# Altium PCB Smart_Connect_Board.PcbDoc (part 1 of 5)
Units mil, origin at the board's own origin, x right, y up, seen from the top; angles counter-clockwise.
Board outline 3543.31 x 3149.61 mil, 2 copper layers (Top Layer, Bottom Layer), stack 61.811 mil thick; 211 components, 139 nets, 660 pads, 247 vias.
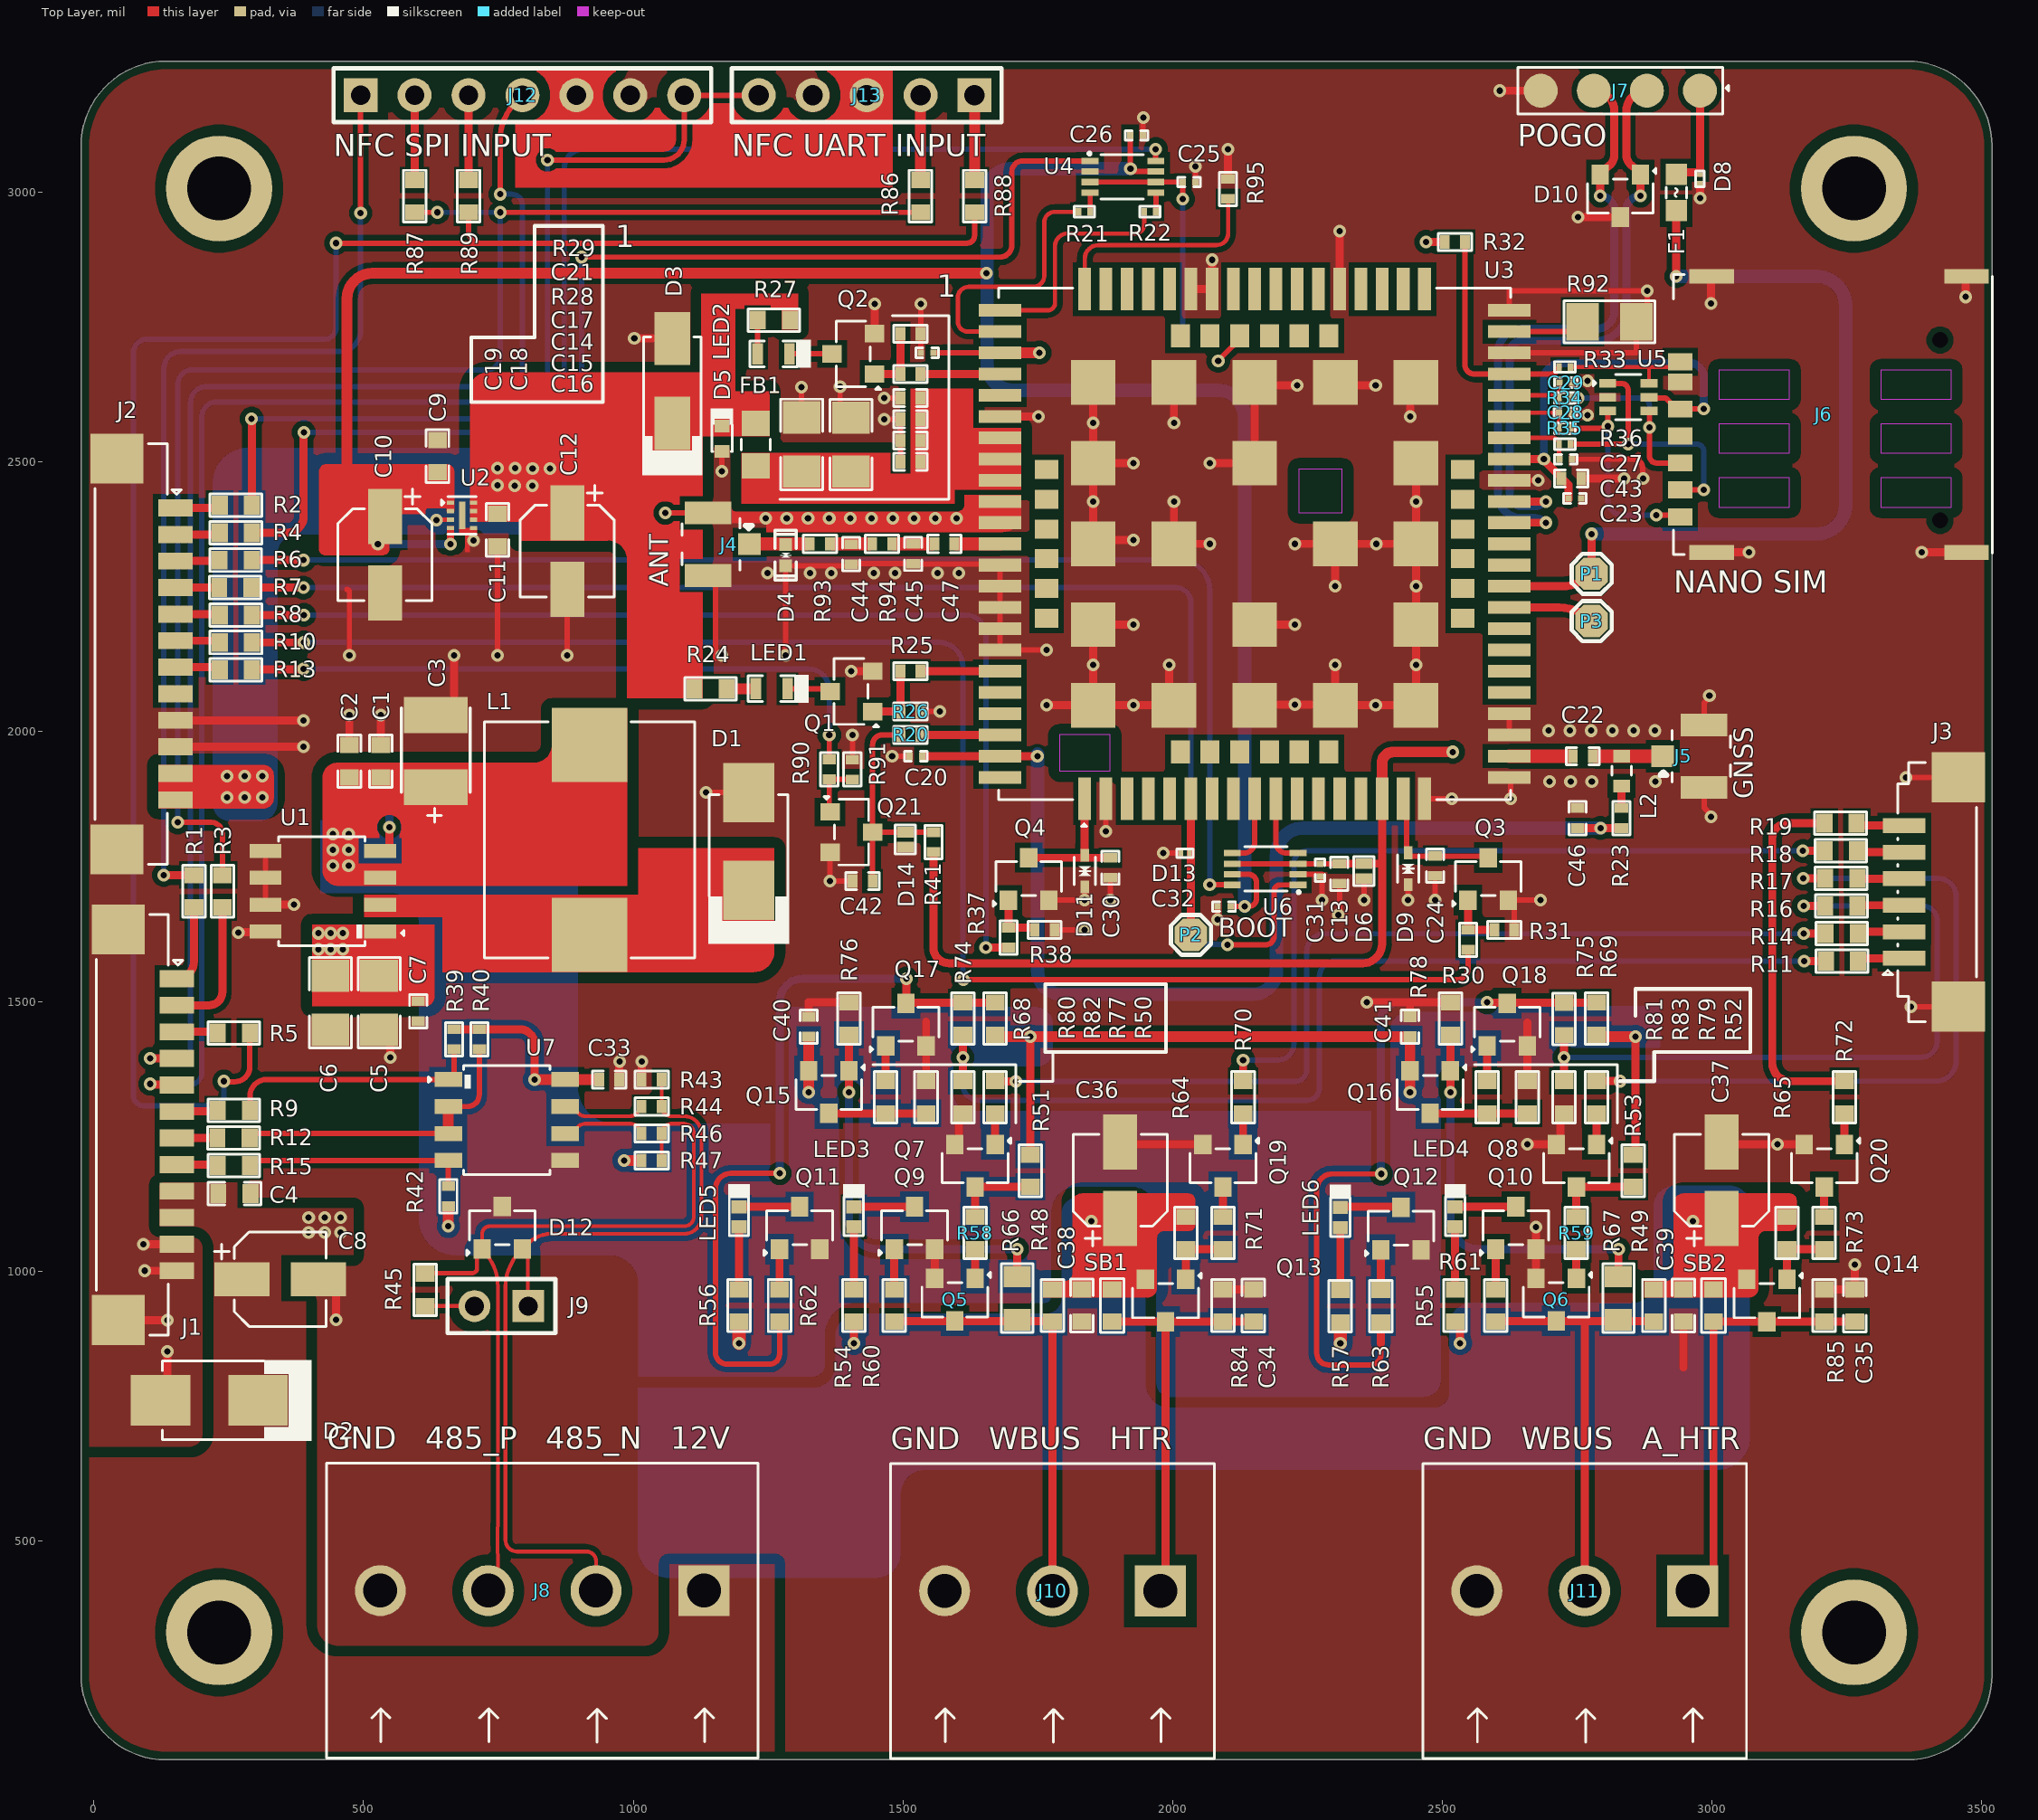
[diagram p0: Top Layer view]
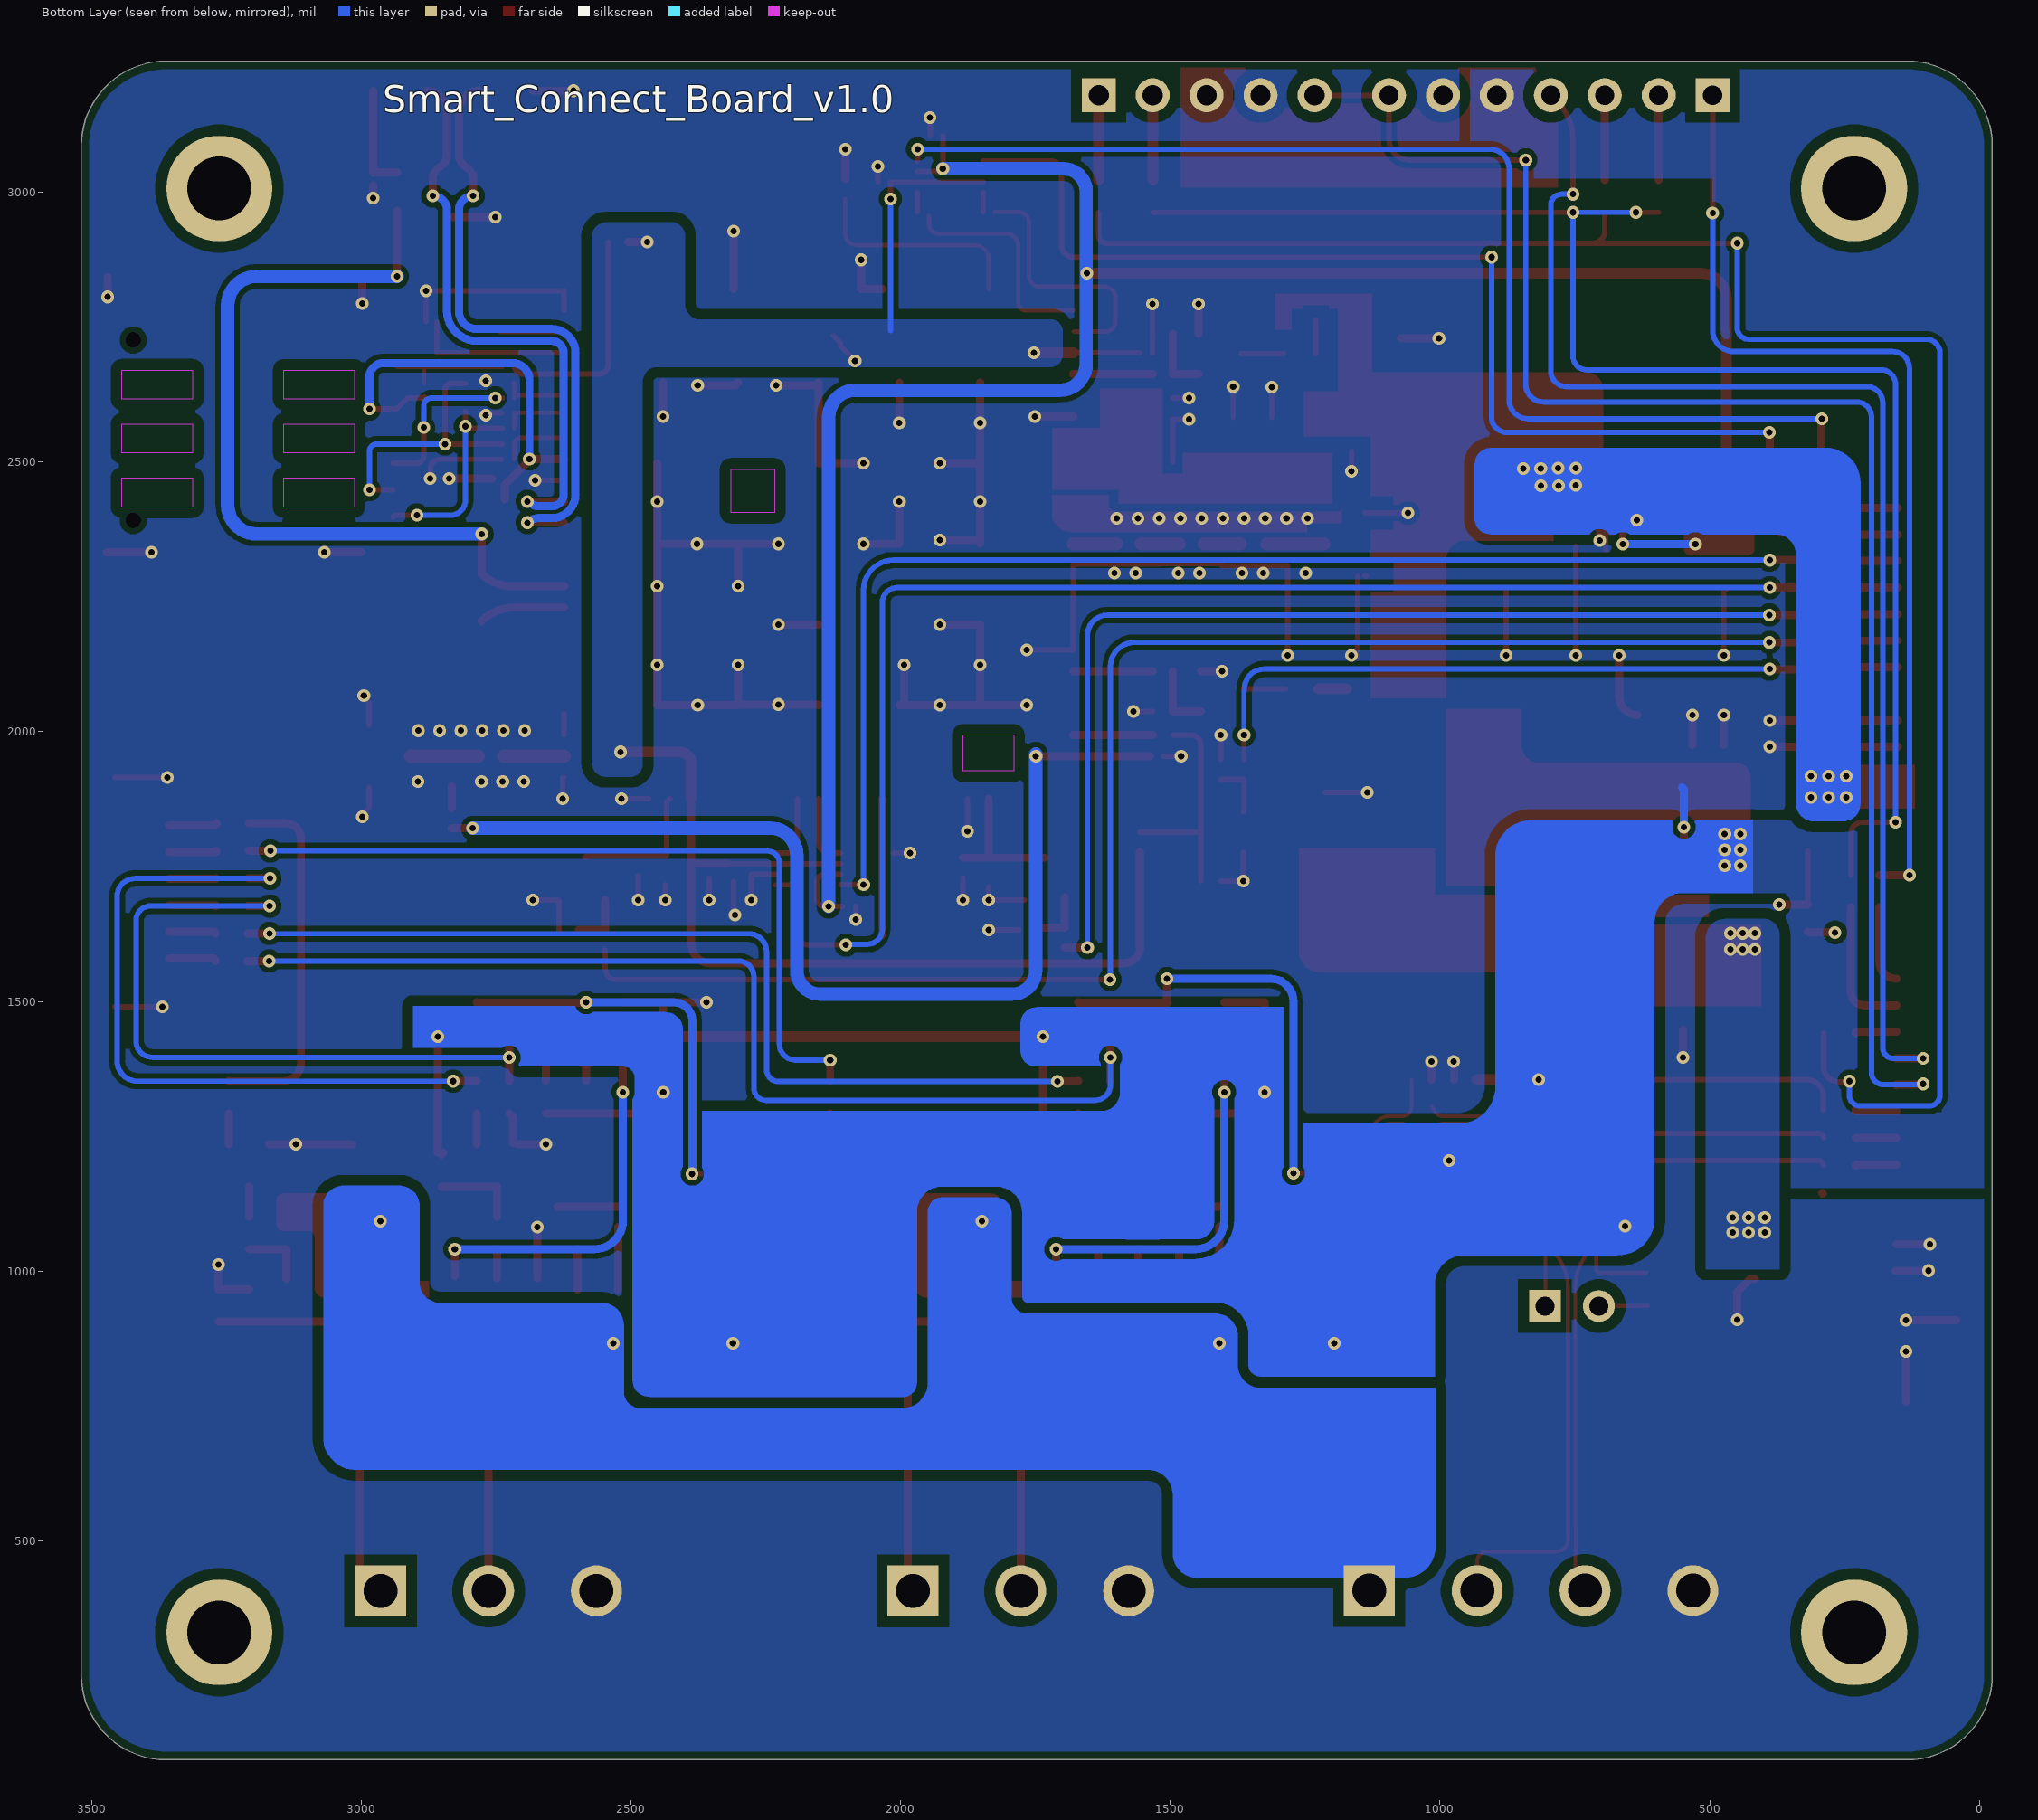
[diagram p1: Bottom Layer view, seen from below]
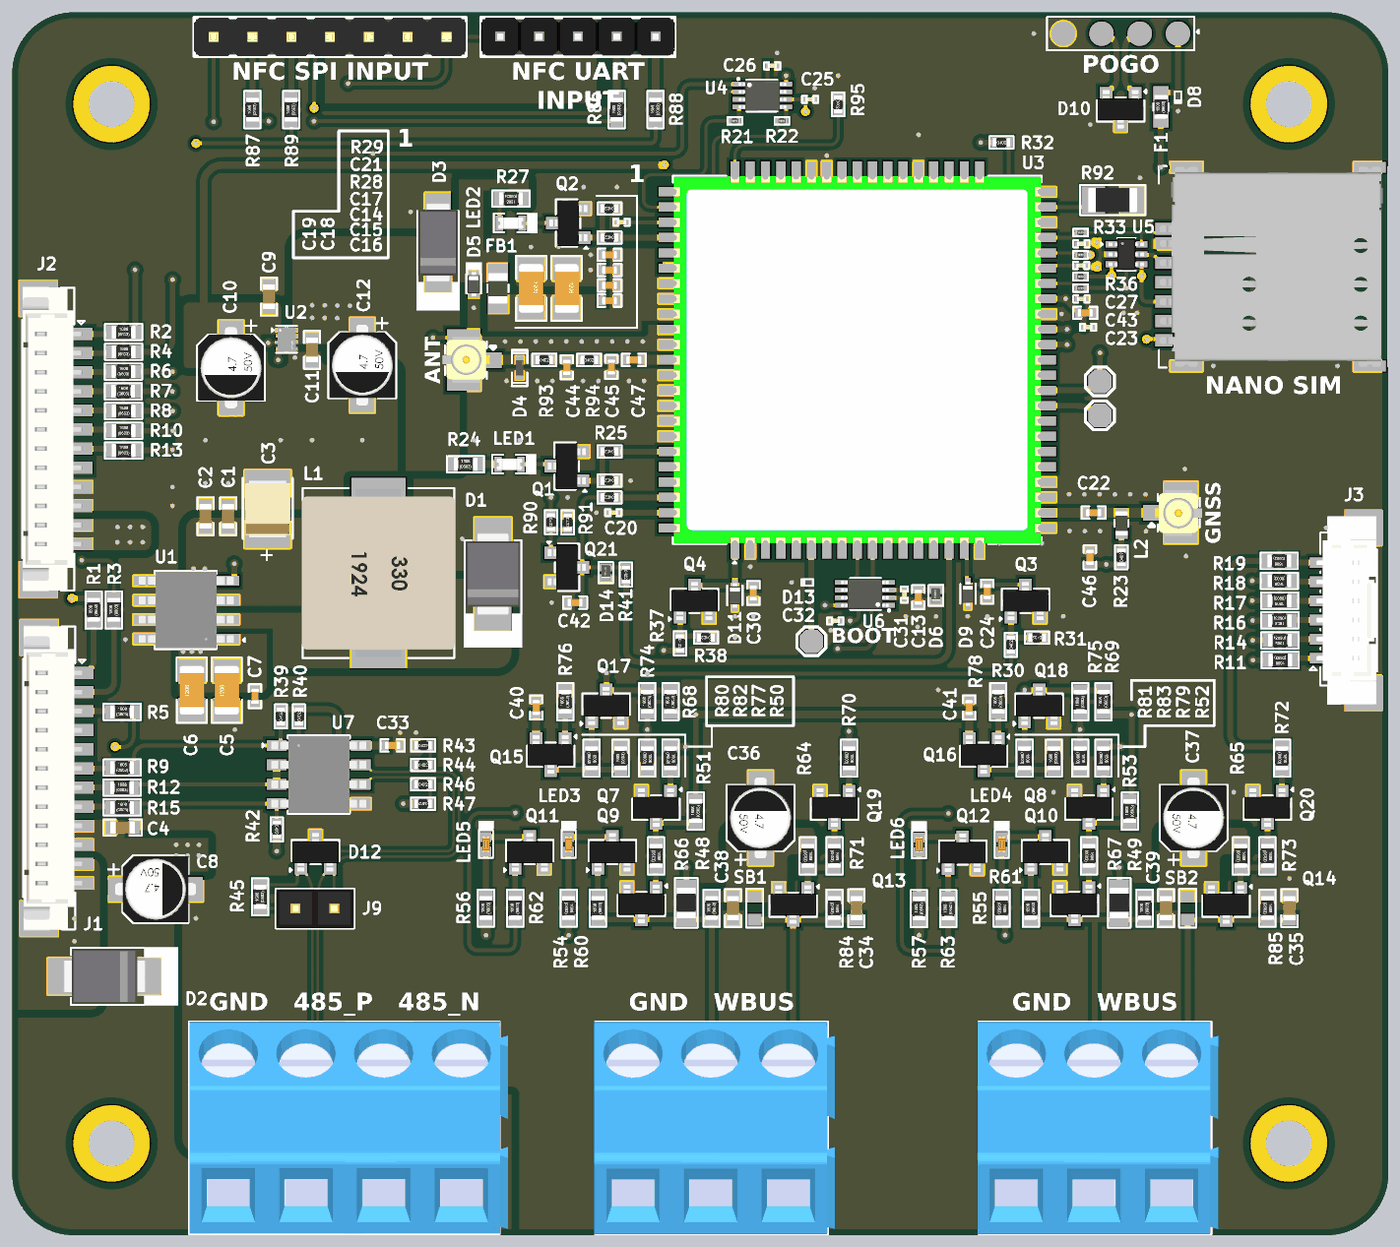
[diagram p4: 3D render of the assembled board from above, using the file's embedded part models]

## Layer stack, top to bottom
Top Solder: solder mask 1, Solder Resist, Dk 3.5
Top Layer: signal copper 1.378
Dielectric 1: dielectric 59.055, FR-4, Dk 4.6
Bottom Layer: signal copper 1.378
Bottom Solder: solder mask 1, Solder Resist, Dk 3.5

## Board outline
-23.91,251.26 -23.91,3085.91 cw(c133.57,3085.91) 133.57,3243.39 3361.92,3243.39 cw(c3361.92,3085.91) 3519.4,3085.91 3519.4,251.26 cw(c3361.92,251.26) 3361.92,93.78 133.57,93.78 cw(c133.57,251.26)

## Design rules (kind name [scope] priority, off if disabled: settings)
BoardOutlineClearance [All] p1: gap=0 ignorepadtopadclearanceinfootprint=FALSE except(10: Arc-OutlineEdge; 15: Poly-OutlineEdge)
Clearance [All] p1: gap=10 ignorepadtopadclearanceinfootprint=FALSE except(4: SMDPad-SMDPad; 6: Arc-Arc Arc-Track Arc-SMDPad Track-Track Track-SMDPad; 7: Arc-Fill Track-Via Track-Fill Track-Region Track-Text SMDPad-Fill SMDPad-Region THPad-THPad Fill-Fill; 8: Region-Region; 20: THPad-Poly Fill-Poly Poly-Poly Poly-Region)
ComponentClearance [All] p1: gap=0 collisioncheckmode=3 verticalgap=0 showdistances=FALSE
DiffPairsRouting Diff_USB [InDifferentialPair('GSM_USB_D')] p1: maxlimit=7 minlimit=7 mostfreqgap=7 toplayer_minwidth=15 toplayer_maxwidth=15 toplayer_prefwidth=15 bottomlayer_minwidth=15 bottomlayer_maxwidth=15 bottomlayer_prefwidth=15 impedanceprofiledriven=TRUE impedanceprofileid={AF431588-A3C0-40A6-A26B-CB03469C8758} impedanceprofilevalue=90.000000 maxuncoupledlength=500
DiffPairsRouting Diff_RS485 [InDifferentialPairClass('DIFF_485')] p2: maxlimit=7 minlimit=7 mostfreqgap=7 toplayer_minwidth=7 toplayer_maxwidth=7 toplayer_prefwidth=7 bottomlayer_minwidth=7 bottomlayer_maxwidth=7 bottomlayer_prefwidth=7 impedanceprofiledriven=TRUE impedanceprofileid={B07F3FA8-E737-4355-8B57-E81E2D3FB21B} impedanceprofilevalue=120.000000 maxuncoupledlength=500
HoleSize [All] p1: absolutevalues=TRUE maxlimit=137.8 minlimit=1 maxpercent=80.000 minpercent=20.000
MatchedLengths "Schematic Matched Net Lengths_1" [InNetClass('GSM_USB')] p1: tolerance=100 checknetsindiffpair=TRUE checkdiffpairvsdiffpair=FALSE checkxsignals=FALSE checkothers=FALSE
MaxMinImpedance "Schematic Impedance Constraint" [InNetClass('GSM_USB')] p1: minimum=88.00 maximum=90.00
MinimumSolderMaskSliver [All] p1: minsoldermaskwidth=0
PolygonConnect [All] p1: connectstyle=Direct reliefconductorwidth=10 reliefentries=4 polygonreliefangle="90 Angle" airgapwidth=10
RoutingVias [All] p1: holewidth=11.81 width=23.62 viastyle="Through Hole" minholewidth=7.87 minwidth=15.75 maxholewidth=23.62 maxwidth=39.37
SilkToSilkClearance [All] p1: silktosilkclearance=0
SilkToSolderMaskClearance [IsPad] p1: minsilkscreentomaskgap=0 clearancetoexposedcopper=TRUE
SolderMaskExpansion [All] p1: expansion=4 istentingtop=FALSE
SupplyNets "Schematic Supply Nets_9" [InNet('SIM_VDD')] p1: voltage=0.000
SupplyNets "Schematic Supply Nets_8" [InNet('VCC')] p2: voltage=0.000
SupplyNets "Schematic Supply Nets_6" [InNet('USB_VBUS')] p3: voltage=0.000
SupplyNets "Schematic Supply Nets_5" [InNet('GSM_PWR')] p4: voltage=0.000
SupplyNets "Schematic Supply Nets_4" [InNet('VDD_EXT')] p5: voltage=0.000
SupplyNets "Schematic Supply Nets_3" [InNet('2V8')] p6: voltage=0.000
SupplyNets "Schematic Supply Nets_2" [InNet('3V3_GSM')] p7: voltage=0.000
SupplyNets "Schematic Supply Nets" [InNet('3V3')] p8: voltage=0.000
SupplyNets "Schematic Supply Nets_7" [InNet('GND')] p9: voltage=0.000
Width [All] p1: maxlimit=100 minlimit=7 preferedwidth=10 minimp=50.000000 maximp=50.000000 favimp=50.000000
24 further rules are at their usual default settings.

## Classes and differential pairs
differential pair class DIFF_485: 485-4 RS485
differential pair class GSM_USB_Lines: GSM_USB_D
net class GSM_USB: GSM_USB_D_N GSM_USB_D_P
component class Ultrasonic_NFC_Sheet: C33 D12 J9 J12 J13 R39 R40 R42 R43 R44 R45 R46 R47 R86 R87 R88 R89 U7
component class Power-Sheet: C1 C2 C3 C4 C5 C6 C7 C8 C9 C10 C11 C12 D1 D2 D3 J1 J2 J3 L1 R1 R2 R3 R4 R5 R6 R7 R8 R9 R10 R11 R12 R13 R14 R15 R16 R17 R18 R19 U1 U2
component class Heater_Sheet: C34 C35 C36 C37 C38 C39 C40 C41 J10 J11 LED3 LED4 LED5 LED6 Q5 Q6 Q7 Q8 Q9 Q10 Q11 Q12 Q13 Q14 Q15 Q16 Q17 Q18 Q19 Q20 R48 R49 R50 R51 R52 R53 R54 R55 R56 R57 R58 R59 R60 R61 R62 R63 R64 R65 R66 R67 R68 R69 R70 R71 R72 R73 R74 R75 R76 R77 R78 R79 R80 R81 R82 R83 R84 R85 SB1 SB2
component class GSM_Sheet: C13 C14 C15 C16 C17 C18 C19 C20 C21 C22 C23 C24 C25 C26 C27 C28 C29 C30 C31 C32 C42 C43 C44 C45 C46 C47 D4 D5 D6 D8 D9 D10 D11 D13 D14 F1 FB1 J4 J5 J6 J7 L2 LED1 LED2 P1 P2 P3 Q1 Q2 Q3 Q4 Q21 R20 R21 R22 R23 R24 R25 R26 R27 R28 R29 R30 R31 R32 R33 R34 R35 R36 R37 R38 R41 R90 R91 R92 R93 R94 R95 U3 U4 U5 U6
differential pair 485-4: +485-4_P -485-4_N
differential pair RS485: +RS485_P -RS485_N
differential pair GSM_USB_D: +GSM_USB_D_P -GSM_USB_D_N

## Components (designator, comment, footprint, x,y, rotation, side; value= is the part's Value field where it differs from the comment)
C1 "0.1uF" Cap-0603 532.09,1945.38 r270 top
C2 "0.1uF" Cap-0603 473.63,1945.37 r270 top
C3 "100uF" Case-B 633.91,1964.08 r90 top
C4 "0.1uF" Cap-0603 260.36,1143.58 r180 top
C5 "47uF" Cap-1206 528.63,1497.26 r90 top
C6 "47uF" Cap-1206 438.63,1497.26 r90 top
C7 "0.1uF" Cap-0402#1 601.19,1481.78 r90 top value=100nF
C8 "10uF" RVT1E100M0405_ 345.08,984.85 r0 top
C9 "0.1uF" Cap-0603 637.13,2511.1 r270 top
C10 "10uF" RVT1E100M0405_ 539.53,2328.1 r270 top
C11 "0.1uF" Cap-0603 748.06,2374.02 r90 top
C12 "10uF" RVT1E100M0405_ 877.5,2334.64 r270 top
C13 "2.2uf" Cap-0402#1 2309.13,1736.86 r270 top
C14 "10pF" Cap-0402#1 1514.06,2579.55 r0 top
C15 "33pF" Cap-0402#1 1514.06,2540.18 r0 top
C16 "0.1uF" Cap-0402#1 1514.06,2500.81 r0 top
C17 "1uF" Cap-0402#1 1514.06,2618.92 r0 top
C18 "100uF" Cap-1206 1403.54,2532.44 r270 top
C19 "100uF" Cap-1206 1312.15,2532.68 r270 top
C20 "0.1uF" CAP-0201#1 1524.05,1954.63 r180 top
C21 "0.1uF" CAP-0201#2 1545.05,2702.66 r180 top
C22 "33pF" Cap-0402#1 2760.65,1954.63 r0 top
C23 "0.1uF" CAP-0201#2 2746.13,2432.63 r0 top
C24 "0.1uf" Cap-0402#1 2486.98,1751.45 r90 top
C25 "0.1uF" CAP-0201#2 2030.76,3019.21 r180 top
C26 "0.1uF" CAP-0201#3 1933.14,3105.5 r180 top
C27 "22pF" CAP-0201#2 2729.43,2505.17 r180 top
C28 "22pF" CAP-0201#2 2728.41,2591.36 r180 top
C29 "22pF" CAP-0201#2 2729.43,2647.27 r180 top
C30 "0.1uf" Cap-0402#1 1884.63,1747.83 r90 top
C31 "0.1uF" CAP-0201#2 2273.41,1743.54 r270 top
C32 "0.1uF" CAP-0201#2 2095.56,1675.83 r180 top
C33 "0.1uf" Cap-0402#1 955.56,1355.05 r180 top
C34 "0.1uF" Cap-0603 2150.04,936.02 r270 top
C35 "0.1uF" Cap-0603 3265.04,936.02 r270 top
C36 "10uF" RVT1E100M0405_ 1903.04,1168.39 r90 top
C37 "10uF" RVT1E100M0405_ 3018.04,1168.39 r90 top
C38 "1uF" Cap-0603 1832.04,936.02 r90 top
C39 "1uF" Cap-0603 2947.04,936.02 r90 top
C40 "1uF" Cap-0402#1 1325.26,1453.02 r270 top
C41 "1uF" Cap-0402#2 2440.26,1453.02 r270 top
C42 "0.1uf" Cap-0402#1 1425.29,1723.02 r0 top
C43 "33pF" Cap-0402#1 2739.43,2469.35 r180 top
C44 "DNP" Cap-0402#1 1404.21,2329.17 r90 top
C45 "DNP" Cap-0402#1 1519.05,2329.83 r90 top
C46 "1uF" Cap-0402#1 2751.15,1839.83 r270 top
C47 "100pF" Cap-0402#1 1577,2348.33 r0 top
D1 "SS510B" SMB_ 1214.09,1796.63 r270 top
D2 "SMBJ5355B-MS" SMB_ 213.9,760.28 r0 top
D3 "1SMA5930BT3G" SMA 1072.5,2650.51 r90 top
D4 "TPESD0402G03V" TPESD0402G03V 1282.68,2327.59 r90 top
D5 "LESD5D5.0CT1G" SOD-523 1164.47,2543.39 r90 top
D6 "LESD8D3.3CAT5G" "SOD-882 Bi Directional" 2354.81,1741.58 r270 top
D8 "PESD5V0H1BSFYL" DSN0603-2 2977.92,3025.13 r90 top
D9 "LESD5D5.0CT1G" "SOD-523 (Bi-Directional)" 2436.91,1745.95 r90 top
D10 "ESD5302F-3/TR" Sot-23 2830.28,2993.63 r180 top
D11 "LESD5D5.0CT1G" "SOD-523 (Bi-Directional)" 1837.08,1741.65 r90 top
D12 "SM712" SOT-23 757.06,1080.06 r0 top
D13 "PESD5V0H1BSFYL" DSN0603-2 2023.3,1775.04 r0 top
D14 "LESD8D3.3CAT5G" "SOD-882 Bi Directional" 1504.56,1800.09 r270 top
F1 "SMD0603-050" Fuse-0603 2934.08,2999.69 r90 top
FB1 "100MHz" Ind-0805 1227.15,2532.4 r90 top
J1 "HC-1.25-12PLT" HC-1.25-12PLT 99.36,1271.28 r270 top
J2 "HC-1.25-12PLT" HC-1.25-12PLT 97.05,2144.27 r270 top
J3 "HC-1.25-6PLT" HC-1.25-6PLT 3406.86,1702.89 r90 top
J4 "U.FL-R-SMT-1(80)" U.FL-R-SMT-1(80)_ 1177.15,2347.67 r90 top
J5 "U.FL-R-SMT-1(80)" U.FL-R-SMT-1(80)_ 2947.15,1954.63 r270 top
J6 "XKNANO-113" XKNANO-113 3206.84,2588.53 r90 top
J7 "POGO Connector 4 Pin" "Pogo 4 Pin" 2830.28,3188.63 r180 top
J8 "TB008A-508-04BE" TB008A-508-04BE 1131.04,407.34 r180 top
J9 "X6511WV-02H-C60D30" HDR1X2_ 805.57,935.05 r180 top
J10 "TB008A-508-03BE" TB008A-508-03BE 1977.35,406.98 r180 top
J11 "TB008A-508-03BE" TB008A-508-03BE 2964.24,406.98 r180 top
J12 "PZ254V-11-07P" HDR1X7 494.54,3180.22 r0 top
J13 "PZ254V-11-05P" HDR1X5_ 1632.78,3180.22 r180 top
L1 "47uH" MDA1040-470M 919.09,1799.26 r90 top
L2 "68nH" "IND-0603 (1608 Metric)" 2832.58,1927.07 r90 top
LED1 "Yellow" LED-0603 1256.56,2079.71 r0 top
LED2 "RED" LED-0603 1260.19,2700.69 r0 top
LED3 "Red" LED-0402 1409.04,1100.32 r90 top
LED4 "Red" LED-0402 2524.04,1100.33 r90 top
LED5 "Red" LED-0402 1196.1,1100.33 r90 top
LED6 "Red" LED-0402 2311.05,1099.14 r90 top
P1 "TEST POINT" Test-point 2777.15,2292.78 r90 top
P2 "TEST POINT" Test-point 2034.04,1623.33 r90 top
P3 "TEST POINT" Test-point 2777.15,2205.22 r90 top
Q1 "MMBT2222A-7-F" SOT-23 1404.42,2074.71 r90 top
Q2 "MMBT2222A-7-F" SOT-23 1408.05,2700.69 r90 top
Q3 "MMBT2222A-7-F" SOT-23 2585.22,1726.96 r0 top
Q4 "MMBT2222A-7-F" SOT-23 1733.15,1726.96 r0 top
Q5 "BC847C,215" SOT-23 1596.36,947 r180 top
Q6 "BC847C,215" SOT-23 2711.36,947 r180 top
Q7 "BC847C,215" SOT-23 1633.76,1195.39 r180 top
Q8 "BC847C,215" SOT-23 2748.76,1195.39 r180 top
Q9 "BC847C,215" SOT-23 1521.56,1079.88 r0 top
Q10 "BC847C,215" SOT-23 2636.56,1079.88 r0 top
Q11 "BC847C,215" SOT-23 1308.64,1079.88 r0 top
Q12 "BC847C,215" SOT-23 2423.58,1078.69 r0 top
Q13 "IRLML6402TRPBF" SOT-23 1987.04,945.39 r180 top
Q14 "IRLML6402TRPBF" SOT-23 3102.04,945.39 r180 top
Q15 "BC857A,215" SOT-23 1362.66,1331.73 r180 top
Q16 "BC857A,215" SOT-23 2477.65,1331.72 r180 top
Q17 "BC847C,215" SOT-23 1505.52,1457.04 r0 top
Q18 "BC847C,215" SOT-23 2620.52,1457.04 r0 top
Q19 "MMBT5551" SOT-23 2093.4,1195.39 r180 top
Q20 "MMBT5551" SOT-23 3208.4,1195.39 r180 top
Q21 "MMBT2222A-7-F" SOT-23 1404.42,1813.87 r270 top
R1 "0R" Res-0603 185.57,1704.27 r270 top
R2 "0R" Res-0603 263.05,2419.94 r180 top
R3 "0R" Res-0603 238.05,1704.27 r270 top
R4 "0R" Res-0603 263.05,2369.06 r180 top
R5 "0R" Res-0603 259.36,1441.52 r180 top
R6 "0R" Res-0603 262.54,2318.18 r180 top
R7 "0R" Res-0603 262.03,2267.3 r180 top
R8 "0R" Res-0603 263.05,2216.42 r180 top
R9 "0R" Res-0603 259.36,1297.88 r180 top
R10 "0R" Res-0603 263.05,2165.54 r180 top
R11 "0R" Res-0603 3241.19,1574.85 r0 top
R12 "0R" Res-0603 258.85,1246.67 r180 top
R13 "0R" Res-0603 263.05,2114.66 r180 top
R14 "0R" Res-0603 3240.68,1625.93 r0 top
R15 "0R" Res-0603 259.36,1195.45 r180 top
R16 "0R" Res-0603 3240.18,1677.02 r0 top
R17 "0R" Res-0603 3239.67,1728.1 r0 top
R18 "0R" Res-0603 3239.16,1779.19 r0 top
R19 "0R" Res-0603 3238.65,1830.28 r0 top
R20 "10K" Res-0402 1514.06,1994 r180 top
R21 "1K" Res-0201 1836.55,2964.06 r0 top
R22 "1K" Res-0201 1958.17,2964.06 r0 top
R23 "10R" Res-0402 2832.15,1839.83 r90 top
R24 "220R" Res-0603 1143.22,2079.44 r180 top
R25 "4.7K" Res-0402 1514.06,2112.11 r180 top
R26 "47K" Res-0402 1514.06,2037.32 r180 top
R27 "220R" Res-0603 1260.66,2763.39 r0 top
R28 "4.7K" Res-0402 1514.06,2663.29 r180 top
R29 "47K" Res-0402 1514.06,2738.09 r180 top
R30 "4.7K" Res-0402 2547.82,1614.32 r90 top
R31 "47K" Res-0402 2615.22,1632.82 r180 top
R32 "47K" Res-0402 2523.56,2908.28 r0 top
R33 "22R" Res-0201 2727.43,2676.29 r180 top
R34 "22R" Res-0201 2727.43,2618.92 r180 top
R35 "22R" Res-0201 2727.43,2562.78 r180 top
R36 "22R" Res-0201 2727.43,2533.18 r180 top
R37 "4.7K" Res-0402 1695.74,1618.32 r270 top
R38 "47K" Res-0402 1762.65,1632.82 r180 top
R39 "4.7K" Res-0402 667.5,1429.78 r90 top
R40 "4.7K" Res-0402 714.5,1429.78 r90 top
R41 "10K" Res-0402 1556.46,1795.37 r270 top
R42 "4.7K" Res-0402 657.23,1138.78 r270 top
R43 "10K" Res-0402 1034.06,1355.05 r0 top
R44 "0R" Res-0402 1034.06,1305.05 r0 top
R45 "120R" Res-0603 614.28,965.05 r270 top
R46 "0R" Res-0402 1034.06,1255.05 r0 top
R47 "10K" Res-0402 1034.06,1205.05 r180 top
R48 "1K" Res-0603 1777.35,936.02 r270 top
R49 "1K" Res-0603 2892.35,936.02 r270 top
R50 "4.7K" Res-0603 1671.17,1322.36 r90 top
R51 "4.7K" Res-0603 1736.32,1186.02 r270 top
R52 "4.7K" Res-0603 2786.17,1322.36 r90 top
R53 "4.7K" Res-0603 2854.04,1186.02 r270 top
R54 "1K" Res-0603 1409.04,936.02 r90 top
R55 "1K" Res-0603 2524.04,936.02 r90 top
R56 "330R" Res-0603 1196.12,936.02 r270 top
R57 "330R" Res-0603 2311.06,934.83 r270 top
R58 "4.7K" Res-0603 1633.76,1070.51 r90 top
R59 "4.7K" Res-0603 2748.76,1070.51 r90 top
R60 "100K" Res-0603 1484.16,936.02 r270 top value=100kR
R61 "100K" Res-0603 2599.16,936.02 r270 top value=100kR
R62 "100K" Res-0603 1271.23,936.02 r270 top value=100kR
R63 "100K" Res-0603 2386.17,934.83 r270 top value=100kR
R64 "10K" Res-0603 2024.44,1070.51 r90 top
R65 "10K" Res-0603 3139.44,1070.51 r90 top
R66 "47K" RES-0805 1711.86,949.77 r270 top
R67 "47K" RES-0805 2826.72,949.74 r270 top
R68 "4.7K" Res-0603 1671.18,1468.02 r270 top
R69 "4.7K" Res-0603 2786.18,1468.02 r270 top
R70 "4.7K" Res-0603 2130.8,1322.36 r90 top
R71 "1K" Res-0603 2093.39,1070.51 r90 top
R72 "4.7K" Res-0603 3245.8,1322.36 r90 top
R73 "1K" Res-0603 3208.39,1070.51 r90 top
R74 "1K" Res-0603 1611.18,1468.02 r270 top
R75 "1K" Res-0603 2726.17,1467.51 r270 top
R76 "150K" Res-0603 1400.06,1468.02 r270 top value=150kR
R77 "DNP" Res-0603 1611.17,1322.36 r90 top
R78 "150K" Res-0603 2515.06,1468.02 r270 top value=150kR
R79 "DNP" Res-0603 2726.18,1322.36 r90 top
R80 "4.7K" Res-0603 1468.12,1322.36 r90 top
R81 "4.7K" Res-0603 2583.12,1322.36 r90 top
R82 "10K" Res-0603 1542.92,1322.36 r270 top
R83 "10K" Res-0603 2657.91,1322.36 r270 top
R84 "1K" Res-0603 2093.39,936.02 r90 top
R85 "1K" Res-0603 3208.39,936.02 r90 top
R86 "0R" Res-0603 1532.78,2993.03 r270 top
R87 "DNP" Res-0603 594.54,2993.03 r270 top
R88 "0R" Res-0603 1632.78,2993.03 r270 top
R89 "DNP" Res-0603 694.54,2993.03 r270 top
R90 "4.7K" Res-0402 1363.42,1930.28 r270 top
R91 "47K" Res-0402 1406.26,1929.89 r270 top
R92 "51R" Res-1206 2810.12,2760.13 r180 top
R93 "0R" Res-0402 1346.04,2348.33 r0 top
R94 "0R" Res-0402 1461.48,2348.33 r0 top
R95 "470K" Res-0402 2103.01,3006.56 r270 top value=470kR
SB1 "Solder Bridge 0603" "Solder Bridge" 1888.03,936.02 r90 top
SB2 "Solder Bridge 0603" "Solder Bridge" 3003.03,936.02 r90 top
U1 "AP1509-33SG-13" SOP-8L 424.28,1704.27 r180 top
U2 "LD56100DPU33R" DFN-8(1.2x1.6) 682.6,2401.14 r0 top
U3 "A7672E (FASE)" "A7672E (FASE)" 2152.15,2348.33 r90 top
U4 "TXB0102DCUT" TXB0102DCUT 1907.97,3029.06 r0 top
U5 "SMF05CT1G-ES" SOT-363 2845.13,2620.29 r0 top
U6 "TXB0102DCUT" TXB0102DCUT 2171.83,1745.51 r180 top
U7 "SP3485EIM/TR" SOP-8 765.49,1280.05 r0 top

## Footprints (in the part's own frame and the unit in brackets; to place one, negate y for a bottom-side part, rotate by r counter-clockwise, add the part's x,y. Pads: shape width x height; smd on the part's side, far side on the other; paste and mask are expansions set on the pad)
"A7672E (FASE)" [mm]
  rect 2x0.6 smd: 1(-12,8) 2(-12,7) 3(-12,6) 4(-12,5) 5(-12,4) 6(-12,3) 7(-12,2) 8(-12,1) 9(-12,0) 10(-12,-1) 11(-12,-2) 12(-12,-3) 13(-12,-4) 14(-12,-5) 15(-12,-6) 16(-12,-7) 17(-12,-8) 35(12,-8) 36(12,-7) 37(12,-6) 38(12,-5) 39(12,-4) 40(12,-3) 41(12,-2) 42(12,-1) 43(12,0) 44(12,1) 45(12,2) 46(12,3) 47(12,4) 48(12,5) 49(12,6) 50(12,7) 51(12,8)
  rect 0.6x2 smd: 18(-8,-12) 19(-7,-12) 20(-6,-12) 21(-5,-12) 22(-4,-12) 23(-3,-12) 24(-2,-12) 25(-1,-12) 26(0,-12) 27(1,-12) 28(2,-12) 29(3,-12) 30(4,-12) 31(5,-12) 32(6,-12) 33(7,-12) 34(8,-12) 52(8,12) 53(7,12) 54(6,12) 55(5,12) 56(4,12) 57(3,12) 58(2,12) 59(1,12) 60(0,12) 61(-1,12) 62(-2,12) 63(-3,12) 64(-4,12) 65(-5,12) 66(-6,12) 67(-7,12) 68(-8,12) 89(-11,-12) 90(-10,-12) 91(-9,-12) 92(9,-12) 93(10,-12) 94(11,-12) 95(11,12) 96(10,12) 97(9,12) 98(-9,12) 99(-10,12) 100(-11,12)
  rect 2.1x2.1 smd: 69(-7.6,7.6) 70(-7.6,3.8) 71(-7.6,0) 72(-7.6,-3.8) 73(-7.6,-7.6) 74(-3.8,-7.6) 75(0,-7.6) 76(3.8,-7.6) 77(7.6,-7.6) 78(7.6,-3.8) 79(7.6,0) 80(7.6,3.8) 81(7.6,7.6) 82(3.8,7.6) 83(0,7.6) 84(-3.8,7.6) 85(-3.8,0) 86(0,-3.8) 87(3.8,0) 88(0,3.8)
  rect 1.1x0.9 smd: 101(-9.8,3.5) 102(-9.8,2.1) 103(-9.8,0.7) 104(-9.8,-0.7) 105(-9.8,-2.1) 106(-9.8,-3.5) 113(9.8,-3.5) 114(9.8,-2.1) 115(9.8,-0.7) 116(9.8,0.7) 117(9.8,2.1) 118(9.8,3.5)
  rect 0.9x1.1 smd: 107(-3.5,-9.8) 108(-2.1,-9.8) 109(-0.7,-9.8) 110(0.7,-9.8) 111(2.1,-9.8) 112(3.5,-9.8) 119(3.5,9.8) 120(2.1,9.8) 121(0.7,9.8) 122(-0.7,9.8) 123(-2.1,9.8) 124(-3.5,9.8)
  Keep-Out Layer region: 1.473,-4.133 3.523,-4.133 3.523,-2.083 1.473,-2.083
  Keep-Out Layer region: -10.7,6.795 -9,6.795 -9,9.195 -10.7,9.195
  silkscreen extent -13.31,-12.06 12.04,12.07, body extent -12,-12 12,12, height 2.5
CAP-0201#1 [mm]
  rect 0.3x0.381 smd mask+0.055: 1(-0.3,0) 2(0.3,0)
  silkscreen extent -0.53,-0.23 0.53,0.23, body extent -0.3,-0.15 0.3,0.15, height 0.28
CAP-0201#2 [mm]
  rect 0.3x0.3 smd mask+0.055: 1(-0.3,0) 2(0.3,0)
  silkscreen extent -0.53,-0.23 0.53,0.23, body extent -0.3,-0.15 0.3,0.15, height 0.28
CAP-0201#3 [mm]
  rect 0.3x0.508 smd mask+0.055: 1(-0.3,0) 2(0.3,0)
  silkscreen extent -0.53,-0.23 0.53,0.23, body extent -0.3,-0.15 0.3,0.15, height 0.28
Cap-0402#1 [mil]
  rect 18x25 smd mask+2.36: 1(-18.5,0) 2(18.5,0)
  silkscreen extent -31,-16 31,16, body extent -20,-10 20,10, height 19
Cap-0402#2 [mil]
  rect 20x25 smd mask+2.36: 1(-18.5,0) 2(18.5,0)
  silkscreen extent -31,-16 31,16, body extent -20,-10 20,10, height 19
Cap-0603 [mil]
  rect 30x35 smd mask+2.36: 1(-30,0) 2(30,0)
  silkscreen extent -49,-21 49,21, body extent -32,-16 31,16, height 34
Cap-1206 [mil] "SMD 1206"
  rect 60x70 smd: 1(-50,0) 2(50,0)
  silkscreen extent -84,-39 84,39, body extent -63,-31 63,32, height 39
Case-B [mm]
  rect 1.7x3 smd paste+0: 1(-1.7,0) 2(1.7,0)
  silkscreen extent -3.35,-1.63 2.03,1.63, body extent -1.85,-1.5 1.85,1.5, height 2.16
DFN-8(1.2x1.6) [mm]
  rect 0.345x0.2 smd paste+0 mask+0.051: 1(-0.547,0.6) 2(-0.547,0.2) 3(-0.547,-0.2) 4(-0.547,-0.6) 5(0.547,-0.6) 6(0.547,-0.2) 7(0.547,0.2) 8(0.547,0.6)
  rect 0.3x1.3 smd paste+0 mask+0.051: 9(0,0)
  silkscreen extent -0.98,-0.88 0.68,0.88, body extent -0.61,-0.81 0.61,0.81, height 0.4
DSN0603-2 [mm]
  rect 0.2x0.381 smd mask+0.055: 1(-0.2,0) 2(0.2,0)
  silkscreen extent -0.38,-0.2 0.38,0.2, body extent -0.3,-0.15 0.3,0.15, height 0.32
Fuse-0603 [mm]
  rect 1x1 smd: 1(-0.85,0) 2(0.85,0)
  silkscreen extent -0.25,-0.48 0.25,0.48, body extent -0.77,-0.42 0.78,0.43, height 0.45
HC-1.25-6PLT [mm]
  rect 0.7x2 smd: 1(-3.125,1.277) 2(-1.875,1.275) 3(-0.625,1.275) 4(0.625,1.275) 5(1.875,1.273) 6(3.125,1.273)
  rect 2.35x2.5 smd paste+0 mask+0.05: MP1(-5.4,-1.277) MP2(5.4,-1.277)
  silkscreen extent -6.11,-2.12 6.09,2.27, body extent -6.15,-2.08 6.15,1.84, height 4.71
HC-1.25-12PLT [mm]
  rect 0.8x1.62 smd paste+0 mask+0.05: 1(-6.875,1.38) 2(-5.625,1.38) 3(-4.375,1.38) 4(-3.125,1.38) 5(-1.875,1.38) 6(-0.625,1.38) 7(0.625,1.38) 8(1.875,1.38) 9(3.125,1.38) 10(4.375,1.38) 11(5.625,1.38) 12(6.875,1.38)
  rect 2.35x2.5 smd paste+0 mask+0.05: MP1(-9.2,-1.38) MP2(9.2,-1.38)
  silkscreen extent -9.91,-2.42 9.91,1.66, body extent -9.97,-2.38 9.97,1.52, height 4.75
HDR1X2_ [mm] "CONN HEADER VERT 2POS 2.54MM"
  rect 1.5x1.5 hole 0.9: 1(0,0)
  round 1.5 hole 0.9: 2(2.54,0)
  silkscreen extent -1.27,-1.27 3.81,1.27, body extent -1.27,-1.27 3.81,1.27, height 8.44
HDR1X5_ [mm] "Connector; Header; 5 Position"
  rect 1.6x1.6 hole 0.95: 1(0,0)
  round 1.6 hole 0.95: 2(2.54,0) 3(5.08,0) 4(7.62,0) 5(10.16,0)
  silkscreen extent -1.27,-1.27 11.43,1.27, body extent -1.27,-1.27 11.43,1.23, height 8.65
HDR1X7 [mm] "Connector; Header; 7 Position"
  rect 1.6x1.6 hole 0.9: 1(0,0)
  round 1.6 hole 0.9: 2(2.54,0) 3(5.08,0) 4(7.62,0) 5(10.16,0) 6(12.7,0) 7(15.24,0)
  silkscreen extent -1.27,-1.27 16.51,1.27, body extent -1.27,-1.24 16.51,1.25, height 8.74
"IND-0603 (1608 Metric)" [mm] "0.063\" L x 0.032\" W (1.60mm x 0.80mm)"
  rect 0.6x0.8 smd: 1(-0.7,0) 2(0.7,0)
  silkscreen extent -0.2,-0.46 0.23,0.46, body extent -0.8,-0.4 0.8,0.4, height 0.78
Ind-0805 [mm] "Inductor 0805"
  rect 1.2x1.32 smd: 1(-1,0) 2(1,0)
  silkscreen extent -0.25,-0.69 0.25,0.69, body extent -1,-0.62 1,0.63, height 0.47
LED-0402 [mm]
  rect 0.62x0.72 smd: 1(-0.475,0) 2(0.475,0)
  silkscreen extent -0.89,-0.51 1.55,0.51, body extent -0.5,-0.25 0.51,0.25, height 0.45
LED-0603 [mm]
  rect 0.5x1 smd: 1(-0.75,0) 2(0.75,0)
  silkscreen extent -1.12,-0.66 1.75,0.66, body extent -0.82,-0.37 0.82,0.36, height 0.68
MDA1040-470M [mm]
  rect 3.5x3.55 smd: 1(-4.475,0) 2(4.475,0)
  silkscreen extent -5.56,-4.95 5.56,4.95, body extent -5.5,-5 5.5,5, height 3.7
"Pogo 4 Pin" [mm]
  round 1.6 smd: 1(-3.75,0) 2(-1.25,0) 3(1.25,0) 4(3.75,0)
  silkscreen extent -5.11,-1.09 4.83,1.09
Res-0201 [mm]
  rect 0.27x0.37 smd mask+0.055: 1(-0.275,0) 2(0.275,0)
  silkscreen extent -0.48,-0.25 0.48,0.25, body extent -0.3,-0.15 0.3,0.15, height 0.29
Res-0402 [mil]
  rect 18x25 smd mask+2.17: 1(-18.5,0) 2(18.5,0)
  silkscreen extent -32,-17 32,16, body extent -23,-11 23,11, height 16
Res-0603 [mil]
  rect 30x35 smd: 1(-30,0) 2(30,0)
  silkscreen extent -48,-21 48,21, body extent -31,-17 31,17, height 18
RES-0805 [mil] "SMD 0805"
  rect 40x50 smd: 1(-40,0) 2(40,0)
  silkscreen extent -64,-29 64,29, body extent -39,-25 39,24, height 24
Res-1206 [mil]
  rect 60x70 smd: 1(-50,0) 2(50,0)
  silkscreen extent -84,-39 84,39, body extent -63,-31 63,31, height 24
RVT1E100M0405_ [mm] "10uF 25V 5.4mm SMD"
  rect 2.6x1.6 smd: 1(-1.8,0) 2(1.8,0)
  silkscreen extent -3.1,-2.22 2.16,2.22, body extent -2.65,-2.15 2.65,2.15, height 5.7
SMA [mm]
  rect 2.5x1.7 smd: 1(-2,0) 2(2,0)
  silkscreen extent -4.45,-1.42 2.06,1.42, body extent -2.6,-1.3 2.6,1.3, height 2.4
SMB_ [mm]
  rect 2.8x2.4 smd: 1(-2.3,0) 2(2.3,0)
  silkscreen extent -2.21,-1.9 4.83,1.91, body extent -2.7,-1.8 2.7,1.8, height 2.3
SOD-523 [mm] "SOD-523 Schottky Barrier Diodes (SBD) ROHS"
  rect 0.6x0.7 smd: 1(-0.6,0) 2(0.6,0)
  silkscreen extent -0.61,-0.53 1.42,0.53, body extent -0.8,-0.4 0.8,0.4, height 0.7
"SOD-523 (Bi-Directional)" [mm]
  rect 0.6x0.4 smd: 1(-0.75,0) 2(0.75,0)
  silkscreen extent -0.65,-0.5 0.65,0.5, body extent -0.8,-0.4 0.8,0.4, height 0.7
"SOD-882 Bi Directional" [mm]
  rect 0.5x0.8 smd mask+0.055: 1(-0.35,0) 2(0.35,0)
  silkscreen extent -0.69,-0.48 0.69,0.48, body extent -0.49,-0.29 0.49,0.29, height 0.48
"Solder Bridge" [mil] "Solder Bridge ON"
  rect 30x35 smd: 1(-30,0) 2(30,0)
  silkscreen extent -50,-22 50,22
SOP-8 [mm]
  rect 1.3x0.7 smd: 1(-2.75,1.905) 2(-2.75,0.635) 3(-2.75,-0.635) 4(-2.75,-1.905) 5(2.75,-1.905) 6(2.75,-0.635) 7(2.75,0.635) 8(2.75,1.905)
  silkscreen extent -3.69,-2.57 2.03,2.57, body extent -3.1,-2.5 3.1,2.5, height 1.76
SOP-8L [mm]
  rect 1.5x0.66 smd: 1(-2.7,1.905) 2(-2.7,0.635) 3(-2.7,-0.635) 4(-2.7,-1.905) 5(2.7,-1.905) 6(2.7,-0.635) 7(2.7,0.635) 8(2.7,1.905)
  silkscreen extent -3.82,-2.57 2.08,2.57, body extent -3.1,-2.5 3.1,2.5, height 1.76
Sot-23 [mm] "TRANS NPN 40V 0.6A SOT23"
  rect 0.82x0.92 smd: 1(-0.95,-1) 2(0.95,-1) 3(0,1)
  silkscreen extent -1.68,-1.3 1.55,0.81, body extent -1.5,-1.25 1.5,1.25, height 1.05
SOT-23 [mm] "TRANS NPN 40V 0.6A SOT23"
  rect 0.82x0.92 smd: 1(-0.95,-1) 2(0.95,-1) 3(0,1)
  silkscreen extent -1.68,-1.3 1.55,0.81, body extent -1.5,-1.25 1.5,1.25, height 1.05
SOT-363 [mm]
  rect 0.8x0.4 smd: 1(-0.97,0.65) 2(-0.97,0) 3(-0.97,-0.65) 4(0.97,-0.65) 5(0.97,0) 6(0.97,0.65)
  silkscreen extent -1.65,-1.07 0.6,1.07, body extent -1.15,-1.05 1.15,1.05, height 1
TB008A-508-03BE [mm]
  rect 2.4x2.4 / inner round 2.4 / far side rect 2.4x2.4 hole 1.6: 1(0,0)
  round 2.4 hole 1.6: 2(5.08,0) 3(10.16,0)
  silkscreen extent -2.54,-6 12.7,7.89, body extent -2.97,-6 12.77,7.89, height 15.82
TB008A-508-04BE [mm]
  rect 2.4x2.4 / inner round 2.4 / far side rect 2.4x2.4 hole 1.6: 1(0,0)
  round 2.4 hole 1.6: 2(5.08,0) 3(10.16,0) 4(15.24,0)
  silkscreen extent -2.54,-6 17.78,7.89, body extent -3.08,-6 17.74,7.89, height 15.82
Test-point [mil]
  oct 60x60 smd: 1(0,0)
  silkscreen extent -37,-37 37,37
TPESD0402G03V [mm]
  rect 0.6x0.6 smd paste-100 mask+0.051: 1(-0.5,0) 2(0.5,0)
  silkscreen extent -1.18,-0.5 1.17,0.51, body extent -0.5,-0.25 0.5,0.25, height 0.35
TXB0102DCUT [mm]
  rect 0.8x0.3 smd: 1(-1.55,0.75) 2(-1.55,0.25) 3(-1.55,-0.25) 4(-1.55,-0.75) 5(1.55,-0.75) 6(1.55,-0.25) 7(1.55,0.25) 8(1.55,0.75)
  silkscreen extent -1.61,-1.04 0.97,1.13, body extent -1.55,-1 1.55,1, height 0.9
U.FL-R-SMT-1(80)_ [mm]
  rect 1.02x1.07 smd: 1(0,-0.974)
  rect 1.07x2.2 smd: 2(1.475,0.974) 3(-1.475,0.974)
  silkscreen extent -1.22,-1.09 1.22,2.21, body extent -1.47,-0.74 1.53,2.36, height 1.2
XKNANO-113 [mm]
  rect 0.7x2.1 smd: 1(-6.5,5.26) 2(6.5,5.26) 3(6.5,-6.74) 4(-6.5,-6.74)
  rect 0.8x1.14 smd: C1(0.25,6.74) C2(-2.29,6.74) C3(-4.83,6.74) C5(1.52,6.74) C6(-1.02,6.74) C7(-3.56,6.74) CD(2.47,6.74)
  rect 0x0 hole 0.75 unplated: MH(-5,-5.49) MH(3.5,-5.49)
  Keep-Out Layer region: 0.714,1.591 2.085,1.591 2.085,4.919 0.714,4.919
  Keep-Out Layer region: -1.826,1.591 -0.455,1.591 -0.455,4.919 -1.826,4.919
  Keep-Out Layer region: -4.366,1.591 -2.995,1.591 -2.995,4.919 -4.366,4.919
  Keep-Out Layer region: 0.714,-6.029 2.085,-6.029 2.085,-2.701 0.714,-2.701
  Keep-Out Layer region: -1.826,-6.029 -0.455,-6.029 -0.455,-2.701 -1.826,-2.701
  Keep-Out Layer region: -4.366,-6.029 -2.995,-6.029 -2.995,-2.701 -4.366,-2.701
  silkscreen extent -6.6,-7.95 6.58,7.06, body extent -6.55,-7.57 6.54,7.01, height 1.37

## Part data
C1 C2 C4 C9 C11 C34 C35: library part CC0603ZRY5V9BB104, "CAP CER 0.1UF 50V Y5V 0603", Capacitance=100nF, Case Code (Imperial)=0603, Case Code (Metric)=1608, Dielectric=Y5V, LCSC Part Number=C106221, Manufacturer=Yageo, Max Operating Temperature=85°C, Min Operating Temperature=-30°C, Package Quantity=1, Supplier Part Number 1=311-1343-1-ND, Tolerance=80%, Voltage=50V, Case/Package=0603, ComponentLink1Description=http://www.yageo.com/documents/recent/UPY-GPHC_Y5V_6.3V-to-50V_8.pdf?src-supplier=Digi-Key, ComponentLink1URL=http://www.yageo.com/documents/recent/UPY-GPHC_Y5V_6.3V-to-50V_8.pdf?src-supplier=Digi-Key, ComponentLink2Description=http://www.yageo.com/documents/recent/UPY-GPHC_Y5V_6.3V-to-50V_5.pdf?src-supplier=Avnet+Europe, ComponentLink2URL=http://www.yageo.com/documents/recent/UPY-GPHC_Y5V_6.3V-to-50V_5.pdf?src-supplier=Avnet+Europe, ComponentLink3Description=https://www.verical.com/server-webapp/html/getDatasheet?partID=403611&src-supplier=Verical, ComponentLink3URL=https://www.verical.com/server-webapp/html/getDatasheet?partID=403611&src-supplier=Verical, ComponentLink4Description=http://www.mouser.com/ds/2/447/Yageo_UPY-GP_NP0_16V-to-50V_9-358835.pdf?src-supplier=Mouser, ComponentLink4URL=http://www.mouser.com/ds/2/447/Yageo_UPY-GP_NP0_16V-to-50V_9-358835.pdf?src-supplier=Mouser, ComponentLink5Description=http://www.farnell.com/datasheets/1132289.pdf?src-supplier=Element14, ComponentLink5URL=http://www.farnell.com/datasheets/1132289.pdf?src-supplier=Element14, Composition=Ceramic, Depth=0.8mm, Halogen Free="Halogen Free", Height=0.8mm, Item Type=Capacitor, Lead Free="Lead Free", Length=1.6mm, Manufacturer Part Number=CC0603ZRY5V9BB104, Mount="Surface Mount", Number of Pins=2, Packaging="Tape and Reel", Pricing 1="1=0.1, 10=0.075, 100=0.0334, 500=0.02386, 1000=0.01874 (USD)", Radiation Hardening=No, REACH SVHC="No SVHC", Stock 1=15000880, Supplier 1=Digi-Key, Termination=SMD/SMT, Thickness=0.035inch, Voltage Rating=50V, Voltage Rating (DC)=50V, Width=0.031inch
C3: library part TAJB107M010RNJ, "CAP TANT 100UF 20% 10V 1411", Case Code (Imperial)=1210, Case Code (Metric)=3528, Dielectric Material=Tantalum, ESR (Equivalent Series Resistance)=1.4R, LCSC Part Number=C7196, Leakage Current=10uA, Manufacturer="Kyocera AVX", Max Operating Temperature=125°C, Min Operating Temperature=-55°C, Package Quantity=2000, Supplier Part Number 1=1354069, Tolerance=10%, Voltage=10V, Case/Package=1210, Category="Tantalum Capacitors", ComponentLink1Description=https://datasheet.ciiva.com/264/taj-264281.pdf?src-supplier=Digi-Key, ComponentLink1URL=https://datasheet.ciiva.com/264/taj-264281.pdf?src-supplier=Digi-Key, ComponentLink2Description=https://datasheet.ciiva.com/264/taj-264280.pdf?src-supplier=Digi-Key, ComponentLink2URL=https://datasheet.ciiva.com/264/taj-264280.pdf?src-supplier=Digi-Key, ComponentLink3Description=https://datasheet.ciiva.com/264/taj-264282.pdf?src-supplier=Digi-Key, ComponentLink3URL=https://datasheet.ciiva.com/264/taj-264282.pdf?src-supplier=Digi-Key, ComponentLink4Description=https://datasheet.ciiva.com/11225/taj-11225964.pdf?src-supplier=Avnet, ComponentLink4URL=https://datasheet.ciiva.com/11225/taj-11225964.pdf?src-supplier=Avnet, ComponentLink5Description=https://datasheet.ciiva.com/11225/taj-11225963.pdf?src-supplier=Avnet, ComponentLink5URL=https://datasheet.ciiva.com/11225/taj-11225963.pdf?src-supplier=Avnet, Construction=Flat, Depth=2.8mm, Dissipation Factor=8%, Features="General Purpose", Height=2.1mm, Item Type=Capacitor, Lead Free="Lead Free", Length=3.5mm, Manufacturer Part Number=TAJB107M010RNJ, Mounting Technology="Surface Mount", Packaging="Tape and Reel", Pricing 1="2000=0.302 (GBP)", Radiation Hardening=No, Reach SVHC Compliant=No, RoHS=Yes, RoHS Compliant=Yes, Series=TAJ, Stock 1=17520, Supplier 1=Rs, Termination=SMD/SMT, Voltage Rating=10V, Voltage Rating (DC)=10V, Width=2.8mm
C5 C6: library part GRM31CR61E476ME44L, "CAP CER 47UF 25V X5R 1206", Dielectric=X5R, LCSC Part Number=C403725, Manufacturer=Murata, Supplier Part Number 1=490-16268-2-ND, Tolerance=20%, Voltage Rating (DC)=25V, Capacitance=47uF, Category="Ceramic Capacitors", ComponentLink1Description=https://search.murata.co.jp/Ceramy/image/img/A01X/partnumbering_e_01.pdf?src-supplier=Digi-Key, ComponentLink1URL=https://search.murata.co.jp/Ceramy/image/img/A01X/partnumbering_e_01.pdf?src-supplier=Digi-Key, Item Type=Capacitor, Length=3.2mm, Manufacturer Part Number=GRM31CR61E476ME44L, RoHS=Yes, Supplier 1=Digi-Key, Thickness=1.6mm, Width=1.6mm
C7: library part GRM155R71E104KE14D, "CAP CER 0.1UF 25V X7R 0402", Case Code (Imperial)=0402, Case Code (Metric)=1005, Dielectric=X7R, Dielectric Material=Ceramic, LCSC Part Number=C77014, Manufacturer=Murata, Max Operating Temperature=125°C, Min Operating Temperature=-55°C, Package Quantity=10000, Tolerance=10%, Voltage=25V, Case/Package=0402, ComponentLink1Description=http://www.farnell.com/datasheets/1872206.pdf?src-supplier=Farnell, ComponentLink1URL=http://www.farnell.com/datasheets/1872206.pdf?src-supplier=Farnell, ComponentLink2Description=http://www.mouser.com/ds/2/281/c02e-2905.pdf?src-supplier=Mouser, ComponentLink2URL=http://www.mouser.com/ds/2/281/c02e-2905.pdf?src-supplier=Mouser, ComponentLink3Description=http://uk.rs-online.com/webdocs/144c/0900766b8144c113.pdf?src-supplier=Rs, ComponentLink3URL=http://uk.rs-online.com/webdocs/144c/0900766b8144c113.pdf?src-supplier=Rs, ComponentLink4Description=https://datasheet.octopart.com/GRM155R71E104KE14D-Murata-datasheet-62346597.pdf?src-supplier=Future+Electronics, ComponentLink4URL=https://datasheet.octopart.com/GRM155R71E104KE14D-Murata-datasheet-62346597.pdf?src-supplier=Future+Electronics, ComponentLink5Description=https://search.murata.co.jp/Ceramy/image/img/A01X/G101/ENG/GRM155R71E104KE14-01.pdf?src-supplier=Digikey, ComponentLink5URL=https://search.murata.co.jp/Ceramy/image/img/A01X/G101/ENG/GRM155R71E104KE14-01.pdf?src-supplier=Digikey, ComponentLink6Description=http://www.farnell.com/datasheets/2048008.pdf?src-supplier=Newark, ComponentLink6URL=http://www.farnell.com/datasheets/2048008.pdf?src-supplier=Newark, ComponentLink7Description=https://datasheet.octopart.com/GRM155R71E104KE14D-Murata-datasheet-62317124.pdf?src-supplier=Element14, ComponentLink7URL=https://datasheet.octopart.com/GRM155R71E104KE14D-Murata-datasheet-62317124.pdf?src-supplier=Element14, ComponentLink8Description=http://psearch.en.murata.com/capacitor/product/GRM155R71E104KE14%23.pdf?src-supplier=Avnet, ComponentLink8URL=http://psearch.en.murata.com/capacitor/product/GRM155R71E104KE14%23.pdf?src-supplier=Avnet, Depth=0.5mm, Height=0.5mm, Item Type=Capacitors, Lead Free=5697LeadFree, Length=1mm, Manufacturer Part Number=GRM155R71E104KE14D, Material=4241ConductorMaterial, Mounting Technology="Surface Mount", Packaging="Tape and Reel", Pins=2NUMBER, Pricing="1=0.1, 10=0.007, 50=0.007, 100=0.005, 1000=0.005, 10000=0.004 (USD)", Reach SVHC Compliant=Unknown, RoHS=Yes, RoHS Compliant=Yes, Series=GRM, Stock=652368, Supplier=Mouser, Termination=SMD/SMT, Thickness=0.022inch, Voltage Rating=25V, Voltage Rating (DC)=25V, Weight=0.000212oz, Width=0.02inch
C8 C10 C12 C36 C37: library part RVT1E100M0405, "CAP ALUM 10uF 25V SMD", LCSC Part Number=C970655, Manufacturer=ROQANG, Operating Temperature=-45℃~+105℃, Rated Voltage=25V, Tolerance=±20%, Capacitance=10uF, ComponentLink1Description=LCSC, ComponentLink1URL=https://www.lcsc.com/product-detail/Aluminum-Electrolytic-Capacitors-SMD_10uF-25V-20_C72484.html, Item Type=Capacitor, L=5.4mm, Manufacturer Part Number=RVT1E100M0405, φD=4mm
C13: library part GRM155R61E225KE11D, "CAP CER 2.2UF 25V X5R 0402", Capacitance=2.2uF, Case Code (Imperial)=0402, Case Code (Metric)=1005, Dielectric=X5R, LCSC Part Number=C385032, Manufacturer=Murata, Max Operating Temperature=85°C, Min Operating Temperature=-55°C, Package Quantity=10000, Resistor Type=Ceramic, Tolerance=10%, Voltage Rating=25V, Case/Package=0402, Category="Ceramic Capacitors", ComponentLink1Description=http://www.mouser.com/ds/2/281/c02e-2905.pdf?src-supplier=Mouser, ComponentLink1URL=http://www.mouser.com/ds/2/281/c02e-2905.pdf?src-supplier=Mouser, ComponentLink2Description=http://search.murata.co.jp/Ceramy/image/img/A01X/G101/ENG/GRM155R61E225KE11-01.pdf?src-supplier=Digi-Key, ComponentLink2URL=http://search.murata.co.jp/Ceramy/image/img/A01X/G101/ENG/GRM155R61E225KE11-01.pdf?src-supplier=Digi-Key, ComponentLink3Description=http://search.murata.co.jp/Ceramy/image/img/A01X/partnumbering_e_01.pdf?src-supplier=Digi-Key, ComponentLink3URL=http://search.murata.co.jp/Ceramy/image/img/A01X/partnumbering_e_01.pdf?src-supplier=Digi-Key, ComponentLink4Description=http://psearch.en.murata.com/capacitor/product/GRM155R61E225KE11%23.pdf?src-supplier=Avnet, ComponentLink4URL=http://psearch.en.murata.com/capacitor/product/GRM155R61E225KE11%23.pdf?src-supplier=Avnet, Height=0.5mm, Item Type=Capacitor, Lead Free="Lead Free", Length=1mm, Manufacturer Part Number=GRM155R61E225KE11D, Material=Ceramic, Mount="Surface Mount", Packaging="Tape and Reel", Pricing 1="10000=0.03830, 20000=0.03623, 40000=0.03416, 60000=0.03209, 80000=0.03002, 100000=0.02795, 1000000=0.02588 (USD)", RoHS=Yes, RoHS Compliant=Yes, Stock 1=210000, Supplier 1=Avnet, Supplier Part Number 1=GRM155R61E225KE11D, Termination=SMD/SMT, Thickness=0.022inch, Voltage Rating (DC)=25V, Weight=0.000212oz, Width=0.5mm
C14: library part GRM1555C1H100JA01D, "CAP CER 10PF 50V C0G/NP0 0402", Case Code (Imperial)=0402, Case Code (Metric)=1005, Dielectric=C0G, LCSC Part Number=C76946, Manufacturer=Murata, Max Operating Temperature=125°C, Min Operating Temperature=-55°C, Package Quantity=1, Tolerance=5%, Voltage=50V, Case/Package=0402, Category="Ceramic Capacitors", ComponentLink1Description=https://datasheet.ciiva.com/2989/product-2989280.pdf?src-supplier=Avnet, ComponentLink1URL=https://datasheet.ciiva.com/2989/product-2989280.pdf?src-supplier=Avnet, ComponentLink2Description=https://datasheet.ciiva.com/18184/getdatasheetpartid-307234-18184164.pdf?src-supplier=Verical, ComponentLink2URL=https://datasheet.ciiva.com/18184/getdatasheetpartid-307234-18184164.pdf?src-supplier=Verical, ComponentLink3Description=https://datasheet.ciiva.com/29200/453545-da-01-en-vs-kondensator-0402-29200107.pdf?src-supplier=Conrad, ComponentLink3URL=https://datasheet.ciiva.com/29200/453545-da-01-en-vs-kondensator-0402-29200107.pdf?src-supplier=Conrad, ComponentLink4Description=https://datasheet.ciiva.com/7828/1666664-7828812.pdf?src-supplier=Element14, ComponentLink4URL=https://datasheet.ciiva.com/7828/1666664-7828812.pdf?src-supplier=Element14, ComponentLink5Description=https://datasheet.ciiva.com/6271/partnumbering-e-01-6271159.pdf?src-supplier=Digi-Key, ComponentLink5URL=https://datasheet.ciiva.com/6271/partnumbering-e-01-6271159.pdf?src-supplier=Digi-Key, ComponentLink6Description=https://datasheet.ciiva.com/6271/partnumbering-e-01-6271158.pdf?src-supplier=Digi-Key, ComponentLink6URL=https://datasheet.ciiva.com/6271/partnumbering-e-01-6271158.pdf?src-supplier=Digi-Key, ComponentLink7Description=https://datasheet.ciiva.com/6271/partnumbering-e-01-6271068.pdf?src-supplier=Digi-Key, ComponentLink7URL=https://datasheet.ciiva.com/6271/partnumbering-e-01-6271068.pdf?src-supplier=Digi-Key, Construction=Flat, Depth=0.5mm, Height=0.5mm, Item Type=Capacitor, Lead Free="Lead Free", Length=1mm, Manufacturer Part Number=GRM1555C1H100JA01D, Material=Ceramic, Mounting Technology="Surface Mount", Packaging="Tape and Reel", Pricing="10000=0.0034, 50000=0.0027, 100000=0.0023, 250000=0.0021 (USD)", Radiation Hardening=No, Reach SVHC Compliant=No, RoHS=Yes, RoHS Compliant=Yes, Series=GRM, Stock=3860000, Supplier="Arrow Electronics", Supplier Part Number=GRM1555C1H100JA01D, Termination=SMD/SMT, Thickness=0.022inch, Voltage Rating=50V, Voltage Rating (DC)=50V, Width=0.02inch
C15 C22 C43: library part GRM1555C1E330JA01D, "CAP CER 33PF 25V C0G/NP0 0402", Case Code (Imperial)=0402, Case Code (Metric)=1005, Dielectric=C0G, LCSC Part Number=C441758, Manufacturer=Murata, Max Operating Temperature=125°C, Min Operating Temperature=-55°C, Package Quantity=1, Supplier Part Number 1=490-6177-1-ND, Tolerance=5%, Voltage=25V, Capacitance=33pF, Case/Package=0402, ComponentLink1Description=https://www.murata.com/~/media/webrenewal/support/library/catalog/products/capacitor/mlcc/c02e.ashx?la=en-us&src-supplier=Digi-Key, ComponentLink1URL=https://www.murata.com/~/media/webrenewal/support/library/catalog/products/capacitor/mlcc/c02e.ashx?la=en-us&src-supplier=Digi-Key, ComponentLink2Description=http://www.mouser.com/ds/2/281/c02e-2905.pdf?src-supplier=Mouser, ComponentLink2URL=http://www.mouser.com/ds/2/281/c02e-2905.pdf?src-supplier=Mouser, ComponentLink3Description=http://psearch.murata.com/capacitor/product/GRM1555C1E330JA01%23.pdf?src-supplier=Avnet, ComponentLink3URL=http://psearch.murata.com/capacitor/product/GRM1555C1E330JA01%23.pdf?src-supplier=Avnet, Construction=Flat, Depth=0.5mm, Height=0.5mm, Item Type=Capacitor, Lead Free="Lead Free", Length=1mm, Manufacturer Part Number=GRM1555C1E330JA01D, Mount="Surface Mount", Packaging="Tape and Reel", Pricing 1="1=0.1, 10=0.034, 50=0.0184, 100=0.0151, 500=0.01078, 1000=0.00847, 2500=0.0077, 5000=0.00708 (USD)", Radiation Hardening=No, RoHS Compliant=Yes, Series=GRM, Stock 1=250773, Supplier 1=Digi-Key, Termination=SMD/SMT, Thickness=0.022inch, Voltage Rating=25V, Voltage Rating (DC)=25V, Width=0.02inch
C16: library part C1005X5R1H104K050BB, "CAP CER 0.1UF 50V X5R 0402", Capacitance=100nF, Case Code (Imperial)=0402, Case Code (Metric)=1005, Dielectric=X5R, Dielectric Material=Ceramic, LCSC Part Number=C2181865, Manufacturer=TDK, Max Operating Temperature=85°C, Min Operating Temperature=-55°C, Package Quantity=1, Supplier Part Number 1=445-5942-1-ND, Tolerance=10%, Voltage=50V, Case/Package=0402, ComponentLink1Description=https://product.tdk.com/info/en/catalog/spec/mlccspec_commercial_general_midvoltage_en.pdf?src-supplier=Digi-Key, ComponentLink1URL=https://product.tdk.com/info/en/catalog/spec/mlccspec_commercial_general_midvoltage_en.pdf?src-supplier=Digi-Key, ComponentLink2Description=http://www.tdk.co.jp/tefe02/e413_c.pdf?src-supplier=Future+Electronics, ComponentLink2URL=http://www.tdk.co.jp/tefe02/e413_c.pdf?src-supplier=Future+Electronics, ComponentLink3Description=https://www.verical.com/server-webapp/html/getDatasheet?partID=743571&src-supplier=Verical, ComponentLink3URL=https://www.verical.com/server-webapp/html/getDatasheet?partID=743571&src-supplier=Verical, ComponentLink4Description=http://www.tdk.co.jp/tefe02/e412_c.pdf?src-supplier=Avnet+Europe, ComponentLink4URL=http://www.tdk.co.jp/tefe02/e412_c.pdf?src-supplier=Avnet+Europe, Construction=Flat, Depth=0.5mm, Height=0.5mm, Item Type=Capacitor, Lead Free="Lead Free", Length=1mm, Manufacturer Part Number=C1005X5R1H104K050BB, Mount="Surface Mount", Packaging="Tape and Reel", Pricing 1="1=0.12, 10=0.09, 50=0.049, 100=0.04, 500=0.02858, 1000=0.02245, 2500=0.02041, 5000=0.01878 (USD)", Radiation Hardening=No, REACH SVHC="No SVHC", Resistor Type=Ceramic, RoHS Compliant=Yes, Series=C, Stock 1=1455182, Supplier 1=Digi-Key, Termination=SMD/SMT, Thickness=0.022inch, Voltage Rating=50V, Voltage Rating (DC)=50V, Weight=2.3E-05oz, Width=0.02inch
C17 C40 C41: library part CC0402KRX5R7BB105, "CAP CER 1UF 16V X5R 0402", Case Code (Imperial)=0402, Case Code (Metric)=1005, Dielectric=X5R, LCSC Part Number=C325464, Manufacturer=Yageo, Max Operating Temperature=85°C, Min Operating Temperature=-55°C, Supplier Part Number 1=311-1691-6-ND, Tolerance=10%, Voltage Rating=16V, Capacitance=1uF, Case/Package=0402, ComponentLink1Description=http://www.yageo.com/documents/recent/UPY-GPHC_X5R_4V-to-50V_12.pdf?src-supplier=Avnet+Europe, ComponentLink1URL=http://www.yageo.com/documents/recent/UPY-GPHC_X5R_4V-to-50V_12.pdf?src-supplier=Avnet+Europe, Composition=Ceramic, Depth=0.5mm, Halogen Free="Halogen Free", Height=0.5mm, Item Type=Capacitor, Lead Free="Lead Free", Length=1mm, Manufacturer Part Number=CC0402KRX5R7BB105, Mount="Surface Mount", Packaging="Tape and Reel", Pricing 1="1=0.36, 10=0.252, 100=0.1512, 500=0.1134, 1000=0.09576, 2500=0.09072, 5000=0.08568 (USD)", Radiation Hardening=No, Stock 1=1405667, Supplier 1=Digi-Key, Termination=SMD/SMT, Thickness=0.022inch, Voltage Rating (DC)=16V, Weight=2.3E-05oz, Width=0.02inch
C18 C19: library part C3216X5R1A107MT0A0E, "CAP CER, X5R, 10 V, 1206 [3216 Metric]", Case Code (Imperial)=1206, Case Code (Metric)=3216, Dielectric=X5R, Dielectric Material=Ceramic, Manufacturer=TDK, Manufacturer Part Number=C3216X5R1A107M160AC, Max Operating Temperature=85°C, Min Operating Temperature=-55°C, Package Quantity=1, Supplier Part Number 1=445-6007-1-ND, Tolerance=20%, Voltage=10V, Capacitance=100uF, Case/Package=1206, Category="Ceramic Capacitors", ComponentLink1Description=https://datasheet.ciiva.com/24216/c3216x5r1a107m160ac-265050-24216592.pdf?src-supplier=Mouser, ComponentLink1URL=https://datasheet.ciiva.com/24216/c3216x5r1a107m160ac-265050-24216592.pdf?src-supplier=Mouser, ComponentLink2Description=https://datasheet.ciiva.com/7975/1796654-7975125.pdf?src-supplier=Element14, ComponentLink2URL=https://datasheet.ciiva.com/7975/1796654-7975125.pdf?src-supplier=Element14, ComponentLink3Description=https://datasheet.ciiva.com/16482/e412-c-16482549.pdf?src-supplier=Future+Electronics, ComponentLink3URL=https://datasheet.ciiva.com/16482/e412-c-16482549.pdf?src-supplier=Future+Electronics, ComponentLink4Description=https://datasheet.ciiva.com/48671/e412-c-48671366.pdf?src-supplier=Avnet, ComponentLink4URL=https://datasheet.ciiva.com/48671/e412-c-48671366.pdf?src-supplier=Avnet, ComponentLink5Description=https://datasheet.ciiva.com/6284/tdkmlcccaprange-6284584.pdf?src-supplier=Digi-Key, ComponentLink5URL=https://datasheet.ciiva.com/6284/tdkmlcccaprange-6284584.pdf?src-supplier=Digi-Key, ComponentLink6Description=https://datasheet.ciiva.com/6284/tdkmlcccaprange-6284586.pdf?src-supplier=Digi-Key, ComponentLink6URL=https://datasheet.ciiva.com/6284/tdkmlcccaprange-6284586.pdf?src-supplier=Digi-Key, ComponentLink7Description=https://datasheet.ciiva.com/17487/e412-c-17487274.pdf?src-supplier=Avnet+Europe, ComponentLink7URL=https://datasheet.ciiva.com/17487/e412-c-17487274.pdf?src-supplier=Avnet+Europe, ComponentLink8Description=https://datasheet.ciiva.com/28620/mlcc-commercial-general-en-28620362.pdf?src-supplier=Element14, ComponentLink8URL=https://datasheet.ciiva.com/28620/mlcc-commercial-general-en-28620362.pdf?src-supplier=Element14, ComponentLink9Description=https://datasheet.ciiva.com/22725/1913358-22725579.pdf?src-supplier=Element14, ComponentLink9URL=https://datasheet.ciiva.com/22725/1913358-22725579.pdf?src-supplier=Element14, ComponentLink10Description=https://datasheet.ciiva.com/6284/tdkmlcccaprange-6284588.pdf?src-supplier=Digi-Key, ComponentLink10URL=https://datasheet.ciiva.com/6284/tdkmlcccaprange-6284588.pdf?src-supplier=Digi-Key, ComponentLink11Description=https://datasheet.ciiva.com/22694/1796654-22694157.pdf?src-supplier=Element14, ComponentLink11URL=https://datasheet.ciiva.com/22694/1796654-22694157.pdf?src-supplier=Element14, Construction=Flat, Depth=1.6mm, Height=1.6mm, Lead Free="Lead Free", Length=3.2mm, Mount="Surface Mount", Packaging="Tape and Reel", Pricing 1="1=1.42000, 10=1.11800, 50=0.96900, 100=0.83860, 500=0.63362, 1000=0.55907 (USD)", Radiation Hardening=No, REACH SVHC="No SVHC", Resistor Type=Ceramic, RoHS=Yes, RoHS Compliant=Yes, Series=C, Stock 1=254695, Supplier 1=Digi-Key, Termination=SMD/SMT, Thickness=0.075inch, Voltage Rating=10V, Voltage Rating (DC)=10V, Weight=0.000571oz, Width=1.6mm
C20 C21 C23 C25 C26 C31 C32: library part GRM033C81E104KE14D, "CAP CER 0.1UF 25V X6S 0201", Capacitance=100nF, Case Code (Imperial)=0201, Case Code (Metric)=0603, Dielectric=X6S, Manufacturer=Murata, Max Operating Temperature=105°C, Min Operating Temperature=-55°C, Package Quantity=15000, Supplier Part Number 1=490-10403-1-ND, Tolerance=10%, Voltage Rating=25V, Case/Package=0201, Category="Ceramic Capacitors", ComponentLink1Description=http://www.mouser.com/ds/2/281/c02e-2905.pdf?src-supplier=Mouser, ComponentLink1URL=http://www.mouser.com/ds/2/281/c02e-2905.pdf?src-supplier=Mouser, ComponentLink2Description=http://www.farnell.com/datasheets/2722733.pdf?src-supplier=Farnell, ComponentLink2URL=http://www.farnell.com/datasheets/2722733.pdf?src-supplier=Farnell, ComponentLink3Description=http://search.murata.co.jp/Ceramy/image/img/A01X/G101/ENG/GRM033C81E104KE14-01.pdf?src-supplier=Digi-Key, ComponentLink3URL=http://search.murata.co.jp/Ceramy/image/img/A01X/G101/ENG/GRM033C81E104KE14-01.pdf?src-supplier=Digi-Key, Height=0.3mm, Length=0.024inch, Manufacturer Part Number=GRM033C81E104KE14D, Mount="Surface Mount", Packaging="Tape and Reel", Pricing 1="1=0.10000, 10=0.05100, 50=0.02780, 100=0.02260, 500=0.01616, 1000=0.01270, 2500=0.01155, 5000=0.01063 (USD)", RoHS=Yes, RoHS Compliant=Yes, Stock 1=91, Supplier 1=Digi-Key, Termination=SMD/SMT, Thickness=0.013inch, Voltage Rating (DC)=25V, Weight=1.2E-05oz, Width=0.3mm
C24 C30 C33 C42: library part GRM155R62A104KE14D, "CAP CER 0.1UF 100V X5R 0402", Capacitance=100nF, Case Code (Imperial)=0402, Case Code (Metric)=1005, Dielectric=X5R, LCSC Part Number=C162178, Manufacturer=Murata, Max Operating Temperature=85°C, Min Operating Temperature=-55°C, Package Quantity=10000, Tolerance=10%, Voltage Rating=100V, Case/Package=0402, Category="Ceramic Capacitors", ComponentLink1Description=http://www.farnell.com/datasheets/2079151.pdf?src-supplier=Farnell, ComponentLink1URL=http://www.farnell.com/datasheets/2079151.pdf?src-supplier=Farnell, ComponentLink2Description=http://www.mouser.com/ds/2/281/c02e-2905.pdf?src-supplier=Mouser, ComponentLink2URL=http://www.mouser.com/ds/2/281/c02e-2905.pdf?src-supplier=Mouser, ComponentLink3Description=http://www.farnell.com/datasheets/2079151.pdf?src-supplier=Element14, ComponentLink3URL=http://www.farnell.com/datasheets/2079151.pdf?src-supplier=Element14, ComponentLink4Description=http://search.murata.co.jp/Ceramy/image/img/A01X/G101/ENG/GRM155R62A104KE14-01.pdf?src-supplier=Digi-Key, ComponentLink4URL=http://search.murata.co.jp/Ceramy/image/img/A01X/G101/ENG/GRM155R62A104KE14-01.pdf?src-supplier=Digi-Key, ComponentLink5Description=http://www.farnell.com/datasheets/2079151.pdf?src-supplier=Newark, ComponentLink5URL=http://www.farnell.com/datasheets/2079151.pdf?src-supplier=Newark, Height=0.5mm, Item Type=Capacitor, Lead Free="Lead Free", Length=0.039inch, Manufacturer Part Number=GRM155R62A104KE14D, Mount="Surface Mount", Packaging="Tape and Reel", Pricing 1="10000=0.00500, 20000=0.00410, 30000=0.00390, 50000=0.00370, 100000=0.00300 (USD)", Reach SVHC Compliant=Yes, RoHS=Yes, RoHS Compliant=Yes, Series=GRM, Stock 1=870000, Supplier 1="Arrow Electronics", Supplier Part Number 1=GRM155R62A104KE14D, Termination=SMD/SMT, Thickness=0.022inch, Voltage Rating (DC)=100V, Weight=0.000212oz, Width=0.02inch